# Altium PCB PCB.PcbDoc (part 9 of 9)
Units mil, origin at the board's own origin, x right, y up, seen from the top; angles counter-clockwise.
Board outline 4330.71 x 3149.61 mil, 8 copper layers (L1_TOP, L2_GND, L3_SIG, L4_PWR, L5_PWR, L6_SIG, L7_GND, L8_BOT), stack 62.406 mil thick; 660 components, 433 nets, 2602 pads, 1254 vias.
Unrouted connection lines stored in the file: 930.
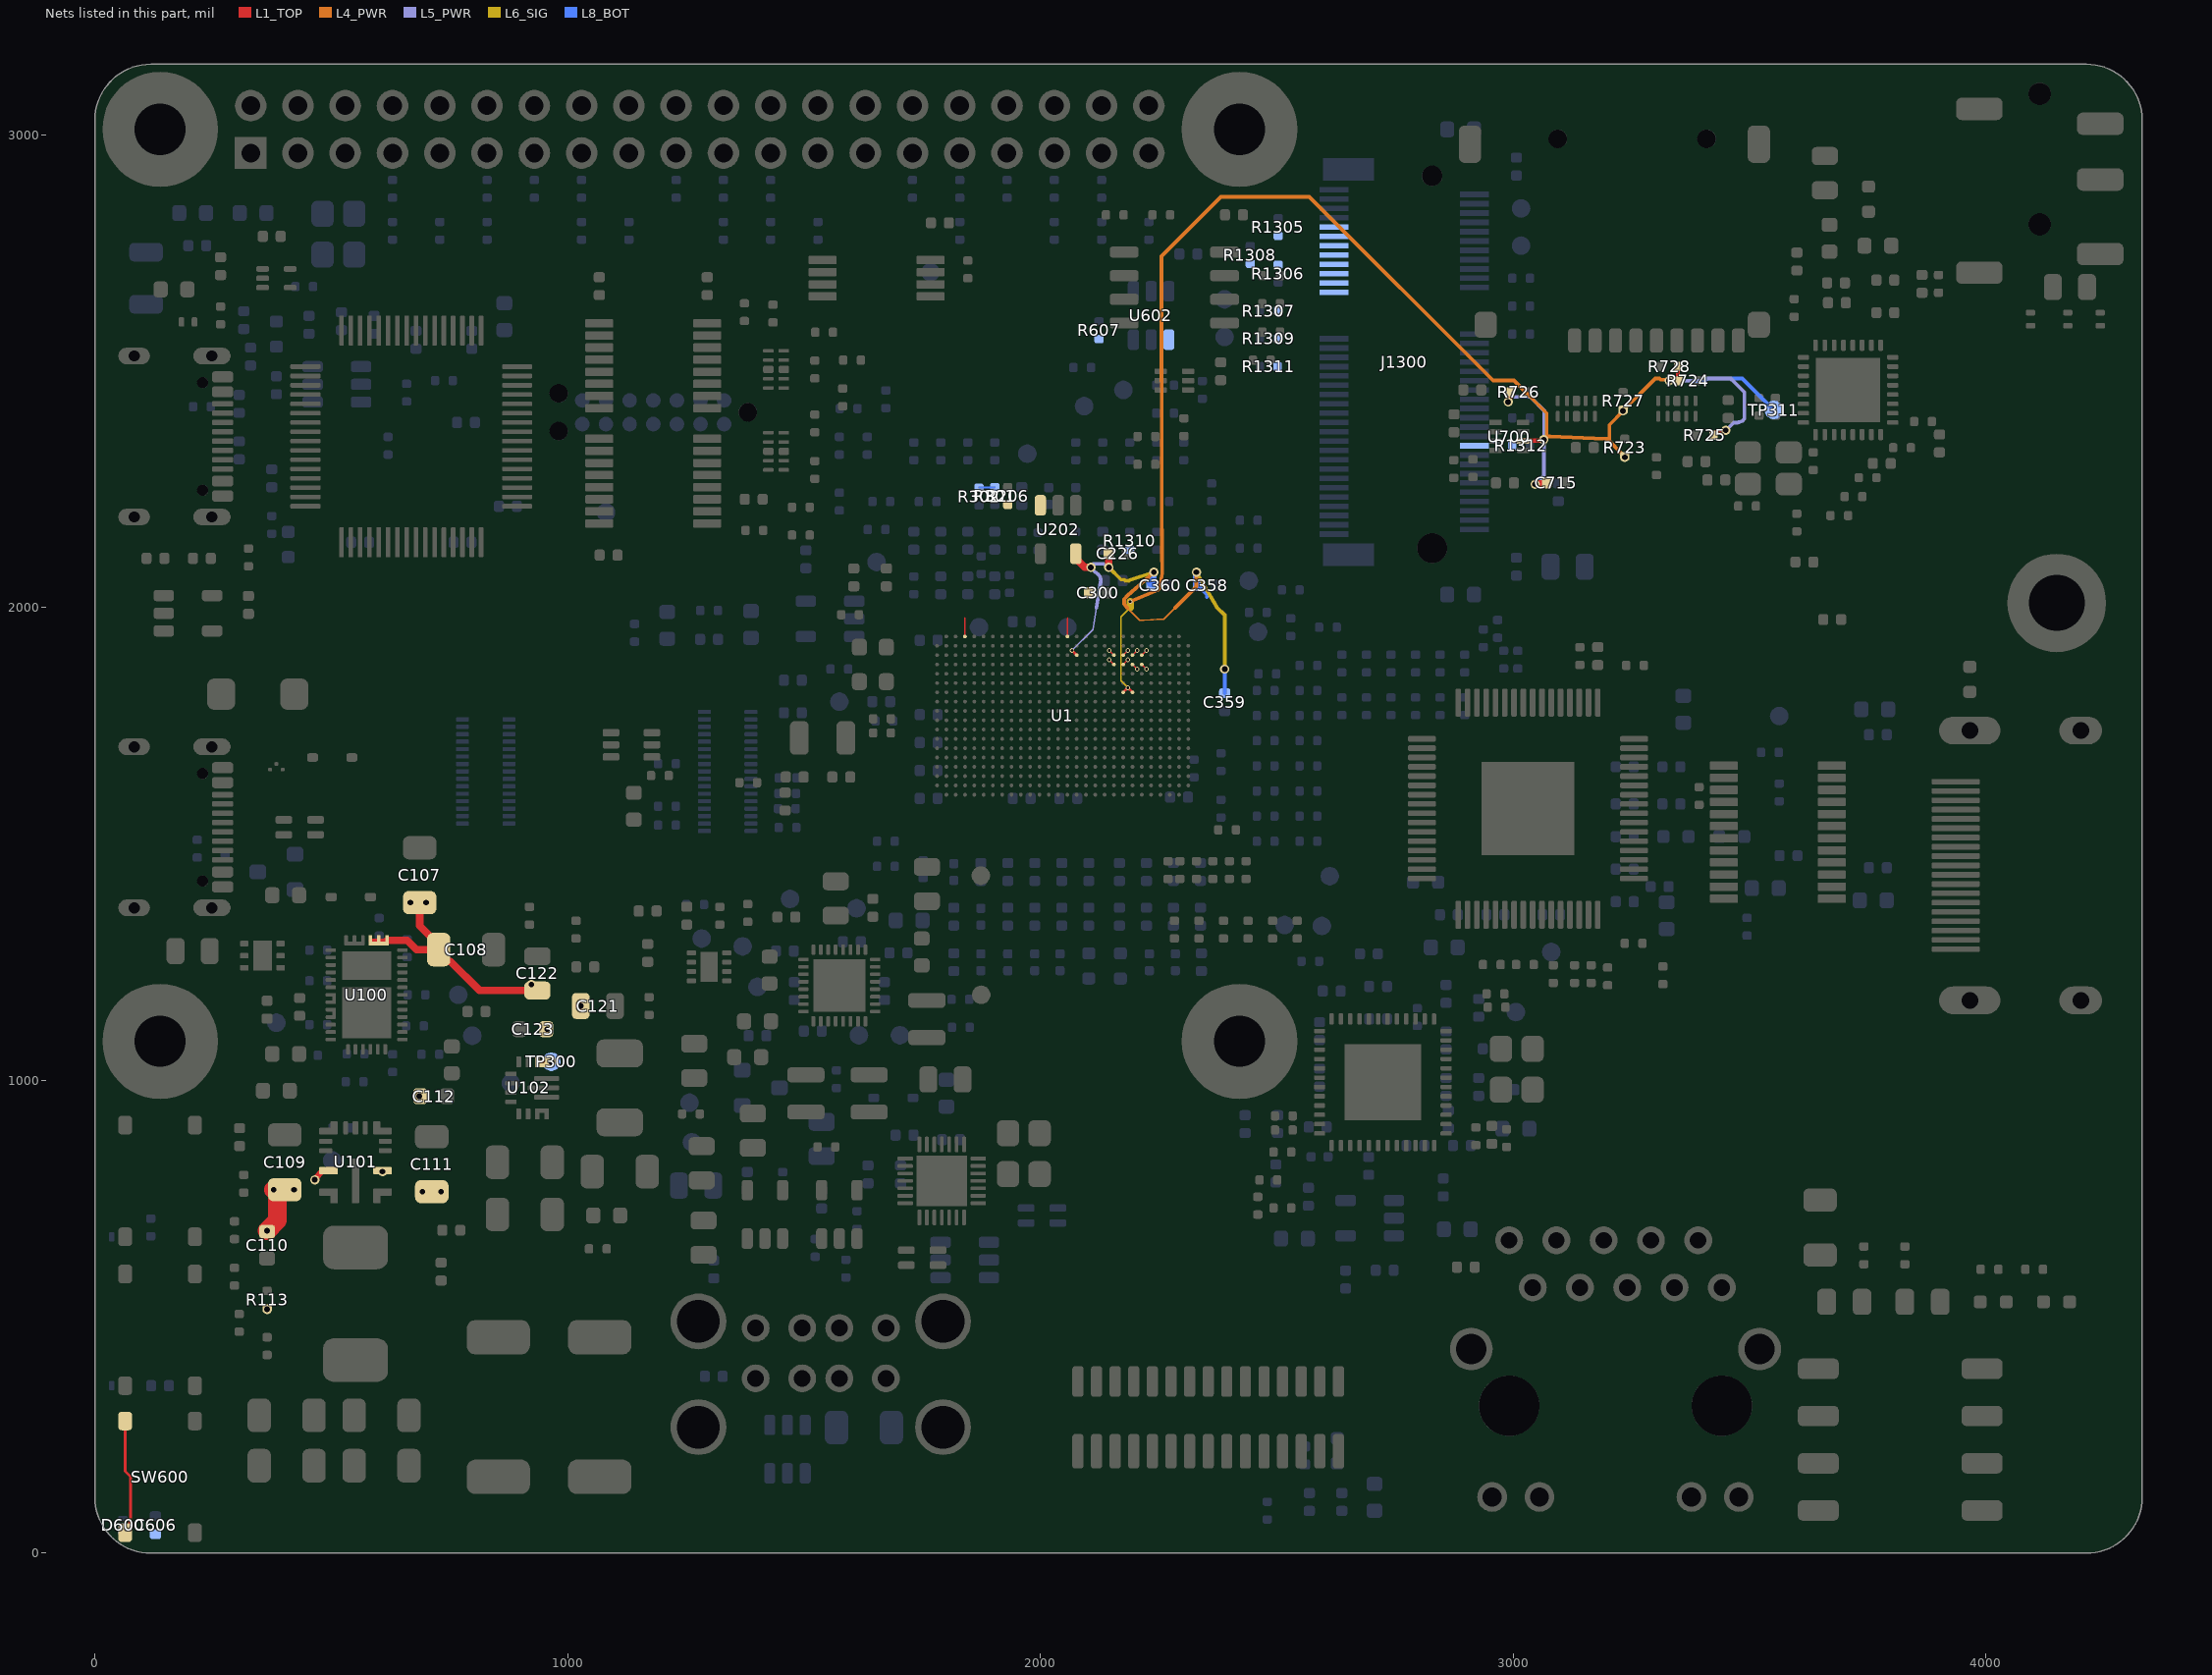
[diagram p12: the nets of this part, all layers, seen from the top]

## Via types
v1: diameter 19.68, hole 11.81, L1_TOP to L8_BOT, 865 vias
v2: diameter 9.84, hole 5.91, L1_TOP to L8_BOT, 246 vias
v3: diameter 15.75, hole 7.87, L1_TOP to L8_BOT, 125 vias
v4: diameter 13.78, hole 7.87, L1_TOP to L8_BOT, 18 vias

## Nets (pads, with @x,y where several pads share a name; then routed paths per layer and width w, separated by ;. In a path a pad name is that pad's centre, name@x,y a point inside that pad or via, vN(x,y) a via of type N, cw(c..) or ccw(c..) an arc to the next point about the centre after c; other vN are vias at no path point) (continued)
VDDSHV5_SD: C715.1 R723.1 R724.1 R725.1 R726.1 R727.1 R728.1 TP311.1 U1.G21 U1.G22 U700.6 | length 3465.3
  L1_TOP w5.91: U1.G21@2175.2,1820.87 v2(2185.04,1830.71) U1.G22@2194.88,1820.87
  L1_TOP w7.87: v1(3330,2480) R724.1@3351.3,2480 3350,2481.3 3350,2490 3348.7,2491.3 R728.1@3348.7,2510 ; R725.1@3423.7,2365 3423.7,2365.72 3428.58,2370.6 3442.41,2370.6 3446.8,2375 v1(3450,2375)
  L1_TOP w9.45: U700.6@3021.26,2352.36 3022.44,2353.54 3063.54,2353.54 v1(3065,2355)
  L1_TOP w14.17: v1(2989.37,2435.04) R726.1@2993.31,2456.69 ; v1(3232.48,2416.34) R727.1@3232.48,2418.31 ; v1(3236.42,2317.91) R723.1@3236.42,2319.88
  L1_TOP w15.75: v1(3046.51,2261.02) 3047.26,2261.78 3069.26,2261.78 C715.1@3071.26,2263.78
  L4_PWR w7.87: v2(2190,2012.8) 2249.32,2037.71 2251.63,2040.02 2252.72,2041.11 2256.86,2066.81 2257.59,2072.9 ccw(c2240,2075) 2257.72,2075.1 2257.47,2118.11 2256.89,2217.07 2256.24,2736.92 2256.24,2743.45 2381.89,2869.09 2568.9,2869.09 2957.68,2480.32 3001.97,2480.32 3070.87,2411.42 v1@3070.87,2362.2 ; v1(3065,2355) 3065,2356.34 v1@3070.87,2362.2 ; 3203.74,2352.36 3203.74,2386.81 3232.87,2415.94 3232.87,2416.73 3301.14,2485 3309.02,2485 3311.76,2482.26 3327.74,2482.26 v1(3330,2480) ; v1(3236.42,2317.91) 3208.44,2347.66 3208.35,2347.75 3199.13,2356.97 3196.06,2357.11 3077.39,2362.2 v1@3070.87,2362.2
  L5_PWR w7.87: v1@2987.2,2436.02 2997.05,2445.87 3036.42,2445.87 3065.94,2416.34 3065.94,2355.94 v1(3065,2355) 3065,2279.52 v1(3046.51,2261.02) ; v1(3330,2480) 3394.04,2480 3399.04,2485 3459.88,2485 3467.38,2477.67 cw(c3455,2465) 3467.58,2477.48 3489.37,2455.51 3489.37,2399.37 3484.76,2394.76 3477.63,2392.09 3474.87,2391.59 3466.59,2391.59 v1(3450,2375)
  L6_SIG w3.54: v2(2185.04,1830.71) 2170.28,1845.47 2170.28,1980.28 2190,2000
  L6_SIG w15.75: 2190,2000 v2(2190,2012.8)
  L8_BOT w7.87: v1(3330,2480) 3406.44,2480 3411.44,2485 3484.69,2485 TP311.1@3551.38,2418.31
VMON_VSYS: C300.1 R301.2 R302.1 U1.A15 | length 73.4
  L1_TOP w3.54: U1.A15@2057.09,1938.98 2057.09,1978.35
  L8_BOT w3.94: R302.1@1870,2253.7 1870.61,2254.31 1902.93,2254.31 R301.2@1903.54,2254.92
VPP_EFUSE_1V8: C226.1 C358.1 C359.1 C360.1 U1.C16 U202.5 | length 1146.2
  L1_TOP w5.91: v2(2066.93,1909.45) U1.C16@2076.77,1899.61
  L1_TOP w15.75: U202.5@2074.8,2114.17 2074.8,2104.33 2093.38,2085.75 2105.98,2085.75 v1(2106.73,2085) ; C226.1@2144.49,2114.17 2144.74,2113.92 2144.74,2085.26 v1(2145,2085)
  L4_PWR w3.54: 2183.85,2000 2189.96,1993.11 2192.27,1990.8 2207.59,1975.48 2210.18,1973.18 2218.66,1973.18 2261.16,1975.73 2285.43,2000
  L4_PWR w7.87: 2183.85,2000 2177.2,2007.5 2177.2,2018.1 2184.7,2025.59 v1(2240,2075) ; 2285.43,2000 2330,2044.57 v1(2330,2075)
  L5_PWR w3.54: v2(2066.93,1909.45) 2108.91,1951.43 2111.22,1953.74 2118.8,2000
  L5_PWR w7.87: v1(2106.73,2085) 2106.73,2088.2 v1@2111.22,2092.68 ; 2118.8,2000 2127.66,2054.1 ccw(c2110.18,2057.01) 2122.06,2070.15 2114.56,2076.93 2111.22,2080.27 2111.22,2085 v1@2111.22,2092.68 ; v1(2145,2085) 2141.8,2085 2134.12,2092.68 v1@2111.22,2092.68
  L6_SIG w7.87: v1(2145,2085) 2170.61,2059.39 2177.81,2059.39 2180.12,2057.09 2186.64,2057.09 v1(2240,2075) ; v1(2330,2075) 2374.02,2000 2390,1984.02 v1(2390,1870)
  L8_BOT w7.87: C358.1@2333.46,2047.24 2333.46,2046.06 2352.36,2027.17 2352.36,2022.64 ; C359.1@2390,1818.9 v1(2390,1870)
  L8_BOT w15.75: C360.1@2232.89,2051.18 2237.8,2051.18 2237.8,2071.73 2240,2073.93 v1(2240,2075) ; v1(2330,2075) 2330.75,2074.25 2330.75,2049.96 C358.1@2333.46,2047.24
VPP_EFUSE_EN: R206.1 U1.A4 U202.3 | length 39.4
  L1_TOP w3.54: U1.A4@1840.55,1938.98 1840.55,1978.35
VSYS_PD: C107.1 C108.1 C109.1 C110.1 C111.1 C112.1 C121.1 C122.1 C123.1 R113.1 TP300.1 U100.20 U100.21 U100.22 U101.8 U101.12 U102.12 U102.13 | length 758.7
  L1_TOP w7.87: U100.22@582.68,1296.26 U100.21@600.39,1296.26 U100.20@618.11,1296.26 ; U100.21@600.39,1289.37 U100.21@600.39,1293.31 ; U102.13@936.02,1039.37 v1(965.55,1039.37) ; U102.12@945.87,1032.48 v1(965.55,1039.37) ; U102.12@955.71,1039.37 v1(965.55,1039.37)
  L1_TOP w12.6: v1(465,790) 465,791.77 482.28,809.06 U101.8@494.09,809.06
  L1_TOP w14.17: v1(364.17,515.75) R113.1@364.17,517.72
  L1_TOP w15.75: U100.20@618.11,1296.26 660.23,1296.26 679.92,1276.57 C108.1@727.36,1276.57 ; v1(686.22,966.54) C112.1@688.19,966.54 ; C107.1@687.01,1375.98 687.01,1327.76 727.36,1287.4 C108.1@727.36,1276.57 ; C122.1@936.02,1190.16 813.78,1190.16 752.19,1251.75 743.76,1251.75 727.36,1268.15 C108.1@727.36,1276.57 ; C123.1@954.53,1108.27 v1(956.5,1108.27)
  L1_TOP w39.37: v1(364.17,681.89) 385.83,703.54 C109.1@385.83,763.78 ; v1(377.95,768.7) 385.83,768.7 C109.1@385.83,763.78 ; C109.1@401.58,768.7 390.75,768.7 C109.1@385.83,763.78 ; C111.1@701.77,764.76 C111.1@712.6,764.76
  other v1: 692.91,764.76 732.28,764.76 421.26,768.7 608.27,807.09 1027.76,1157.48 923.35,1202.83 667.32,1375.98 700.56,1375.98
WARMRST_BTN_N: C606.1 D600.1 R607.2 SW600.1 SW600.2 U602.1 | length 246
  L1_TOP w5.91: SW600.1@63.98,43.31 73.05,52.38 73.05,69.08 75.79,71.81 75.79,161.57 63.98,173.38 SW600.2@63.98,279.53
WL_SDIO_CLK: J1300.9 R1310.1 U1.D23 | length 13.9
  L1_TOP w3.54: U1.D23@2214.57,1879.92 v2(2224.41,1870.08)
WL_SDIO_CMD: J1300.11 R1305.2 U1.C23 | length 13.9
  L1_TOP w3.54: U1.C23@2214.57,1899.61 v2(2224.41,1909.45)
WL_SDIO_D0: J1300.13 R1306.2 U1.D22 | length 13.9
  L1_TOP w3.54: U1.D22@2194.88,1879.92 v2(2204.72,1870.08)
WL_SDIO_D1: J1300.15 R1307.2 U1.C22 | length 13.9
  L1_TOP w3.54: U1.C22@2194.88,1899.61 v2(2204.72,1909.45)
WL_SDIO_D2: J1300.17 R1308.2 U1.D21 | length 13.9
  L1_TOP w3.54: U1.D21@2175.2,1879.92 v2(2185.04,1889.76)
WL_SDIO_D3: J1300.19 R1309.2 U1.C21 | length 13.9
  L1_TOP w3.54: U1.C21@2175.2,1899.61 v2(2185.04,1909.45)
WLAN_EN: J1300.23 J1300.56 R1312.1 U1.D20 | length 13.9
  L1_TOP w3.54: v2(2145.67,1889.76) U1.D20@2155.51,1879.92
WLAN_IRQ: J1300.21 R1311.2 U1.C20 | length 13.9
  L1_TOP w3.54: v2(2145.67,1909.45) U1.C20@2155.51,1899.61
pads on no net: D901.2 D903.2 J100. J100.A8 J100.B8 J702. J800. J1000.14 J1100. J1300. J1300.3 J1300.5 J1300.6 J1300.8 J1300.10 J1300.12 J1300.14 J1300.16 J1300.35 J1300.37 J1300.38 J1300.40 J1300.41 J1300.42 J1300.43 J1300.44 J1300.46 J1300.47 J1300.48 J1300.49 J1300.52 J1300.53 J1300.55 J1300.58 J1300.59 J1300.60 J1300.61 J1300.65 J1300.66 J1300.67 J1300.68 J1300.70 J1300.71 J1300.73 J1500. J1500.A8 J1500.B8 J1501. U1.A3 U1.A5 U1.A24 U1.A25 U1.A26 U1.B4 U1.B5 U1.B24 U1.B25 U1.C24 U1.C26 U1.D1 U1.D2 U1.D24 U1.D26 U1.E14 U1.E15 U1.F3 U1.F4 U1.F5 U1.F6 U1.F7 U1.F8 U1.F9 U1.F10 U1.F15 U1.F16 U1.F17 U1.F18 U1.G3 U1.G4 U1.G5 U1.G6 U1.G7 U1.G8 U1.G9 U1.G17 U1.G18 U1.H3 U1.H4 U1.H5 U1.H6 U1.H7 U1.H8 U1.H9 U1.H10 U1.H11 U1.H23 U1.J2 U1.J3 U1.J4 U1.J5 U1.J6 U1.J7 U1.J8 U1.J9 U1.J10 U1.J11 U1.J23 U1.K3 U1.K4 U1.K5 U1.K23 U1.L3 U1.L4 U1.L12 U1.L16 U1.L23 U1.M3 U1.M11 U1.M14 U1.M15 U1.M16 U1.M17 U1.M18 U1.M19 U1.N15 U1.N16 U1.N17 U1.N18 U1.N19 U1.P2 U1.P6 U1.P7 U1.P8 U1.P9 U1.P14 U1.P15 U1.R1 U1.R2 U1.R5 U1.R6 U1.R7 U1.R8 U1.R9 U1.R10 U1.R11 U1.R12 U1.R13 U1.R14 U1.R15 U1.R16 U1.R17 U1.R18 U1.R23 U1.T1 U1.T2 U1.T4 U1.T5 U1.T6 U1.T7 U1.T8 U1.T9 U1.T10 U1.T11 U1.T12 U1.T13 U1.T14 U1.T15 U1.T16 U1.T17 U1.T18 U1.T24 U1.U2 U1.U3 U1.U4 U1.U5 U1.U6 U1.U7 U1.U8 U1.U9 U1.U13 U1.U14 U1.U18 U1.V3 U1.V4 U1.V5 U1.V6 U1.V7 U1.V8 U1.V9 U1.V13 U1.V14 U1.V18 U202.4 U203.4 U800.13 U800.18 U800.20 U800.21 U800.22 U800.23 U800.39 U800.40 U800.45 U800.48 U900.1 U900.2 U900.4 U900.5 U900.10 U900.13 U900.14 U900.15 U900.16 U900.22 U900.25 U1000.49 U1100.10 U1100.11 U1100.12 U1100.13 U1100.20 U1100.22 U1100.27 U1100.28 U1100.29 U1100.30 U1500.18 U1500.19 U1500.21 U1500.22 U1500.23 U1500.24 U1500.28 U1500.29 U1500.30 U1500.32 U1500.33 U1500.34 U1500.36 U1500.40 U1500.41 U1500.43 U1500.44 U1500.45 U1500.46 U1500.53 U1500.54 U1500.55 U1500.57 U1500.58 U1500.59 U1501.2 U1502.4
copper on no net: | length 46.2
  L3_SIG w7: 315,1560 315,1535 330,1520

## Polygon pours and split planes (outlines as drawn)
VCC_3V3_SYS on L5_PWR "L5_PWR-VCC_3V3_SYS" (solid, remove dead copper, pour order 19): 21.65,78.16 78.16,21.65 4252.55,21.65 4309.06,78.16 4309.06,3071.45 4252.55,3127.95 78.16,3127.95 21.65,3071.45
VDD_SD_3V3 on L5_PWR "L5_PWR-VDD_SD_3V3" (solid, remove dead copper, pour order 14): 3110.24,2283.46 3464.57,2283.46 3464.57,2598.43 3110.24,2598.43
VDDS_DDR_1V2 on L5_PWR "L5_PWR-VDDS_DDR_1V2" (solid, remove dead copper, pour order 1): 1417.32,1440.94 1980.32,1440.94 1980.32,1787.4 1417.32,1787.4
VCC_3V3_MAIN on L5_PWR "L5_PWR-VCC_3V3_MAIN" (solid, remove dead copper, pour order 18): 21.65,78.16 78.16,21.65 1496.06,21.65 1496.06,826.77 1633.86,826.77 1633.86,1062.99 1787.4,1062.99 1787.4,1433.07 1401.57,1433.07 1401.57,1228.35 1307.09,1228.35 1307.09,1488.19 1102.36,1488.19 1102.36,1346.46 21.65,1346.46
VCC_3V3_TFP_DVDD on L5_PWR "L5_PWR-VCC_3V3_TFP_DVDD" (solid, remove dead copper, pour order 11): 2830.71,1259.84 3200.79,1259.84 3200.79,1901.57 3133.86,1901.57 3133.86,1440.94 2830.71,1440.94
VDDA_1V8 on L5_PWR "L5_PWR-VDDA_1V8" (solid, remove dead copper, pour order 3): 1795.28,1157.48 2307.09,1157.48 2307.09,1433.07 1417.32,1433.07 1417.32,1220.47 1464.57,1220.47 1464.57,1354.33 1795.28,1354.33
VDD_CORE_0V85 on L5_PWR "L5_PWR-VDDR_CORE_0V85" (solid, remove dead copper, pour order 2): 2074.8,1519.68 2314.96,1519.68 2314.96,1196.85 2370.08,1196.85 2370.08,1582.68 2153.54,1582.68 2153.54,1834.65 2074.8,1834.65
VDDA_3V3_AUD on L5_PWR "L5_PWR-VDDA_3V3_AUD" (solid, remove dead copper, pour order 15): 3590.55,2519.68 3826.77,2519.68 3826.77,2629.92 3889.76,2629.92 3889.76,2685.04 3826.77,2685.04 3826.77,2850.39 3590.55,2850.39
VCC_3V3_DBG on L5_PWR "L5_PWR-VCC_3V3_DBG" (solid, remove dead copper, pour order 17): 181.1,1992.13 413.39,1992.13 413.39,2070.87 1393.7,2070.87 1393.7,2716.54 181.1,2716.54
VDDA_2V5_PHY on L5_PWR "L5_PWR-VDDA_2V5_PHY" (solid, remove dead copper, pour order 9): 2618.11,649.61 3031.5,649.61 3031.5,834.65 2834.65,834.65 2834.65,877.95 2618.11,877.95
VCC_3V3_TFP_TVDD on L5_PWR "L5_PWR-VCC_3V3_TFP_TVDD" (solid, remove dead copper, pour order 13): 3228.35,1535.43 3401.57,1535.43 3401.57,1496.06 3464.57,1496.06 3464.57,1692.91 3228.35,1692.91
VCC_3V3_TFP_PVDD on L5_PWR "L5_PWR-VCC_3V3_TFP_PVDD" (solid, remove dead copper, pour order 12): 3228.35,1358.27 3346.46,1358.27 3346.46,1527.56 3228.35,1527.56
VCC_3V3_CAM on L5_PWR "L5_PWR-VCC_3V3_CAM" (solid, remove dead copper, pour order 16): 2566.93,23.62 2728.35,23.62 2728.35,212.6 2566.93,212.6
VDD_SDIO_LDO1 on L5_PWR "L5_PWR-VDD_SDIO_LDO1" (solid, remove dead copper, pour order 7): 1795.28,1110.24 2362.2,1110.24 2362.2,1149.61 1795.28,1149.61
VDD_1V8 on L4_PWR "L4_PWR-VDD_1V8" (solid, remove dead copper, pour order 35): 1637.8,578.74 3377.95,578.74 3377.95,1503.94 4309.06,1503.94 4309.06,3071.45 4252.55,3127.95 1944.88,3127.95 1944.88,2208.66 2185.04,2208.66 2185.04,968.5 1657.48,968.5 1657.48,1157.48 1633.86,1157.48 1633.86,960.63 1582.68,960.63 1582.68,870.08 1637.8,870.08
VDD_CORE_0V85 on L4_PWR "L4_PWR-VDD_CORE_0V85" (solid, remove dead copper, pour order 30): 1661.42,976.38 2177.17,976.38 2177.17,2200.79 1661.42,2200.79
VCC_5V0 on L4_PWR "L4_PWR-VCC_5V0" (solid, remove dead copper, pour order 34): 795.28,21.65 984.25,21.65 984.25,700.79 1582.68,700.79 1582.68,417.32 1622.05,417.32 1622.05,21.65 4252.55,21.65 4309.06,78.16 4309.06,1496.06 3385.83,1496.06 3385.83,570.87 1629.92,570.87 1629.92,866.14 1279.53,866.14 1279.53,2118.11 1653.54,2118.11 1653.54,2208.66 1937.01,2208.66 1937.01,3127.95 78.16,3127.95 21.65,3071.45 21.65,1877.95 618.11,1877.95 618.11,1425.2 1122.05,1425.2 1122.05,984.25 795.28,984.25
VDD_1V0_PHY on L4_PWR "L4_PWR-VDD_1V0_PHY" (solid, remove dead copper, pour order 24): 2370.08,582.68 2688.98,582.68 2688.98,818.9 3031.5,818.9 3031.5,1291.34 2370.08,1291.34
VBUS_USBA1 on L4_PWR "L4_PWR-VBUS_USBA1" (solid, remove dead copper, pour order 21): 984.25,21.65 1614.17,21.65 1614.17,409.45 984.25,409.45
VBUS_USBC on L4_PWR "L4_PWR-VBUS_USBC" (solid, remove dead copper, pour order 20): 21.65,1125.98 610.24,1125.98 610.24,1870.08 21.65,1870.08
VSYS_PD on L4_PWR "L4_PWR-VSYS_PD" (solid, remove dead copper, pour order 33): 21.65,78.16 78.16,21.65 787.4,21.65 787.4,984.25 1114.17,984.25 1114.17,1417.32 618.11,1417.32 618.11,1118.11 21.65,1118.11
VDDS_DDR_1V2 on L4_PWR "L4_PWR-VDDS_DDR_1V2" (solid, remove dead copper, pour order 31): 1287.4,874.02 1574.8,874.02 1574.8,968.5 1625.98,968.5 1625.98,1165.35 1653.54,1165.35 1653.54,1496.06 1287.4,1496.06
VBUS_DBG on L4_PWR "L4_PWR-VBUS_DBG" (solid, remove dead copper, pour order 25): 125.98,1929.13 377.95,1929.13 377.95,2811.02 153.54,2811.02 153.54,2598.43 125.98,2598.43
VDD_1V8_DBG on L4_PWR "L4_PWR-VDD_1V8_DBG" (solid, remove dead copper, pour order 27): 385.83,2188.98 913.39,2188.98 913.39,2606.3 385.83,2606.3
VCC_5V0_HDMI on L4_PWR "L4_PWR-VCC_5V0_HDMI" (solid, remove dead copper, pour order 23): 3771.65,1279.53 4015.75,1279.53 4015.75,1468.5 3771.65,1468.5
VDD_1V8 on L4_PWR "L4_PWR-VDDSHV4" (solid, remove dead copper, pour order 32): 1287.4,1503.94 1645.67,1503.94 1645.67,2110.24 1287.4,2110.24
VCC_5V0_HDR on L4_PWR "L4_PWR-VCC_5V0_HDR" (solid, remove dead copper, pour order 26): 78.74,2818.9 456.69,2818.9 456.69,3125.98 78.74,3125.98
VBUS_USBA2 on L4_PWR "L4_PWR-VBUS_USBA2" (solid, remove dead copper, pour order 22): 984.25,417.32 1574.8,417.32 1574.8,692.91 984.25,692.91
GND on L2_GND "L2_GND-GND" (solid, remove dead copper, shelved, pour order 36): 21.65,78.16 78.16,21.65 4252.55,21.65 4309.06,78.16 4309.06,3071.45 4252.55,3127.95 78.16,3127.95 21.65,3071.45
GND on L7_GND "L7_GND-GND" (solid, remove dead copper, shelved, pour order 37): 21.65,78.16 78.16,21.65 4252.55,21.65 4309.06,78.16 4309.06,3071.45 4252.55,3127.95 78.16,3127.95 21.65,3071.45

## Silkscreen, mask and mechanical layers (free items; w line width, h text height)
Mechanical 13:
  lines w3.94: 728.35,1397.64 728.35,1909.45 1437.01,1909.45 1437.01,1397.64 728.35,1397.64 ; 2716.54,2086.61 2716.54,2952.76 4022.24,2952.76 4022.24,2086.61 2716.54,2086.61
  text "BACK: M.2 2230 card, 1.5 mm under it" at 2736.22,2106.3 h39.37
  text "BACK: eMMC module, nothing under it" at 748.03,1417.32 h39.37